# Altium PCB NB3000XN.PcbDoc (part 8 of 71)
Units mil, origin at the board's own origin, x right, y up, seen from the top; angles counter-clockwise.
Board outline 9527.56 x 6929.77 mil, 6 copper layers (Top Layer, GND+SHIELD, MidLayer1, MidLayer2, P2 - 3V3+5V0, Bottom Layer), stack 62.375 mil thick; 832 components, 1027 nets, 4655 pads, 4981 vias.
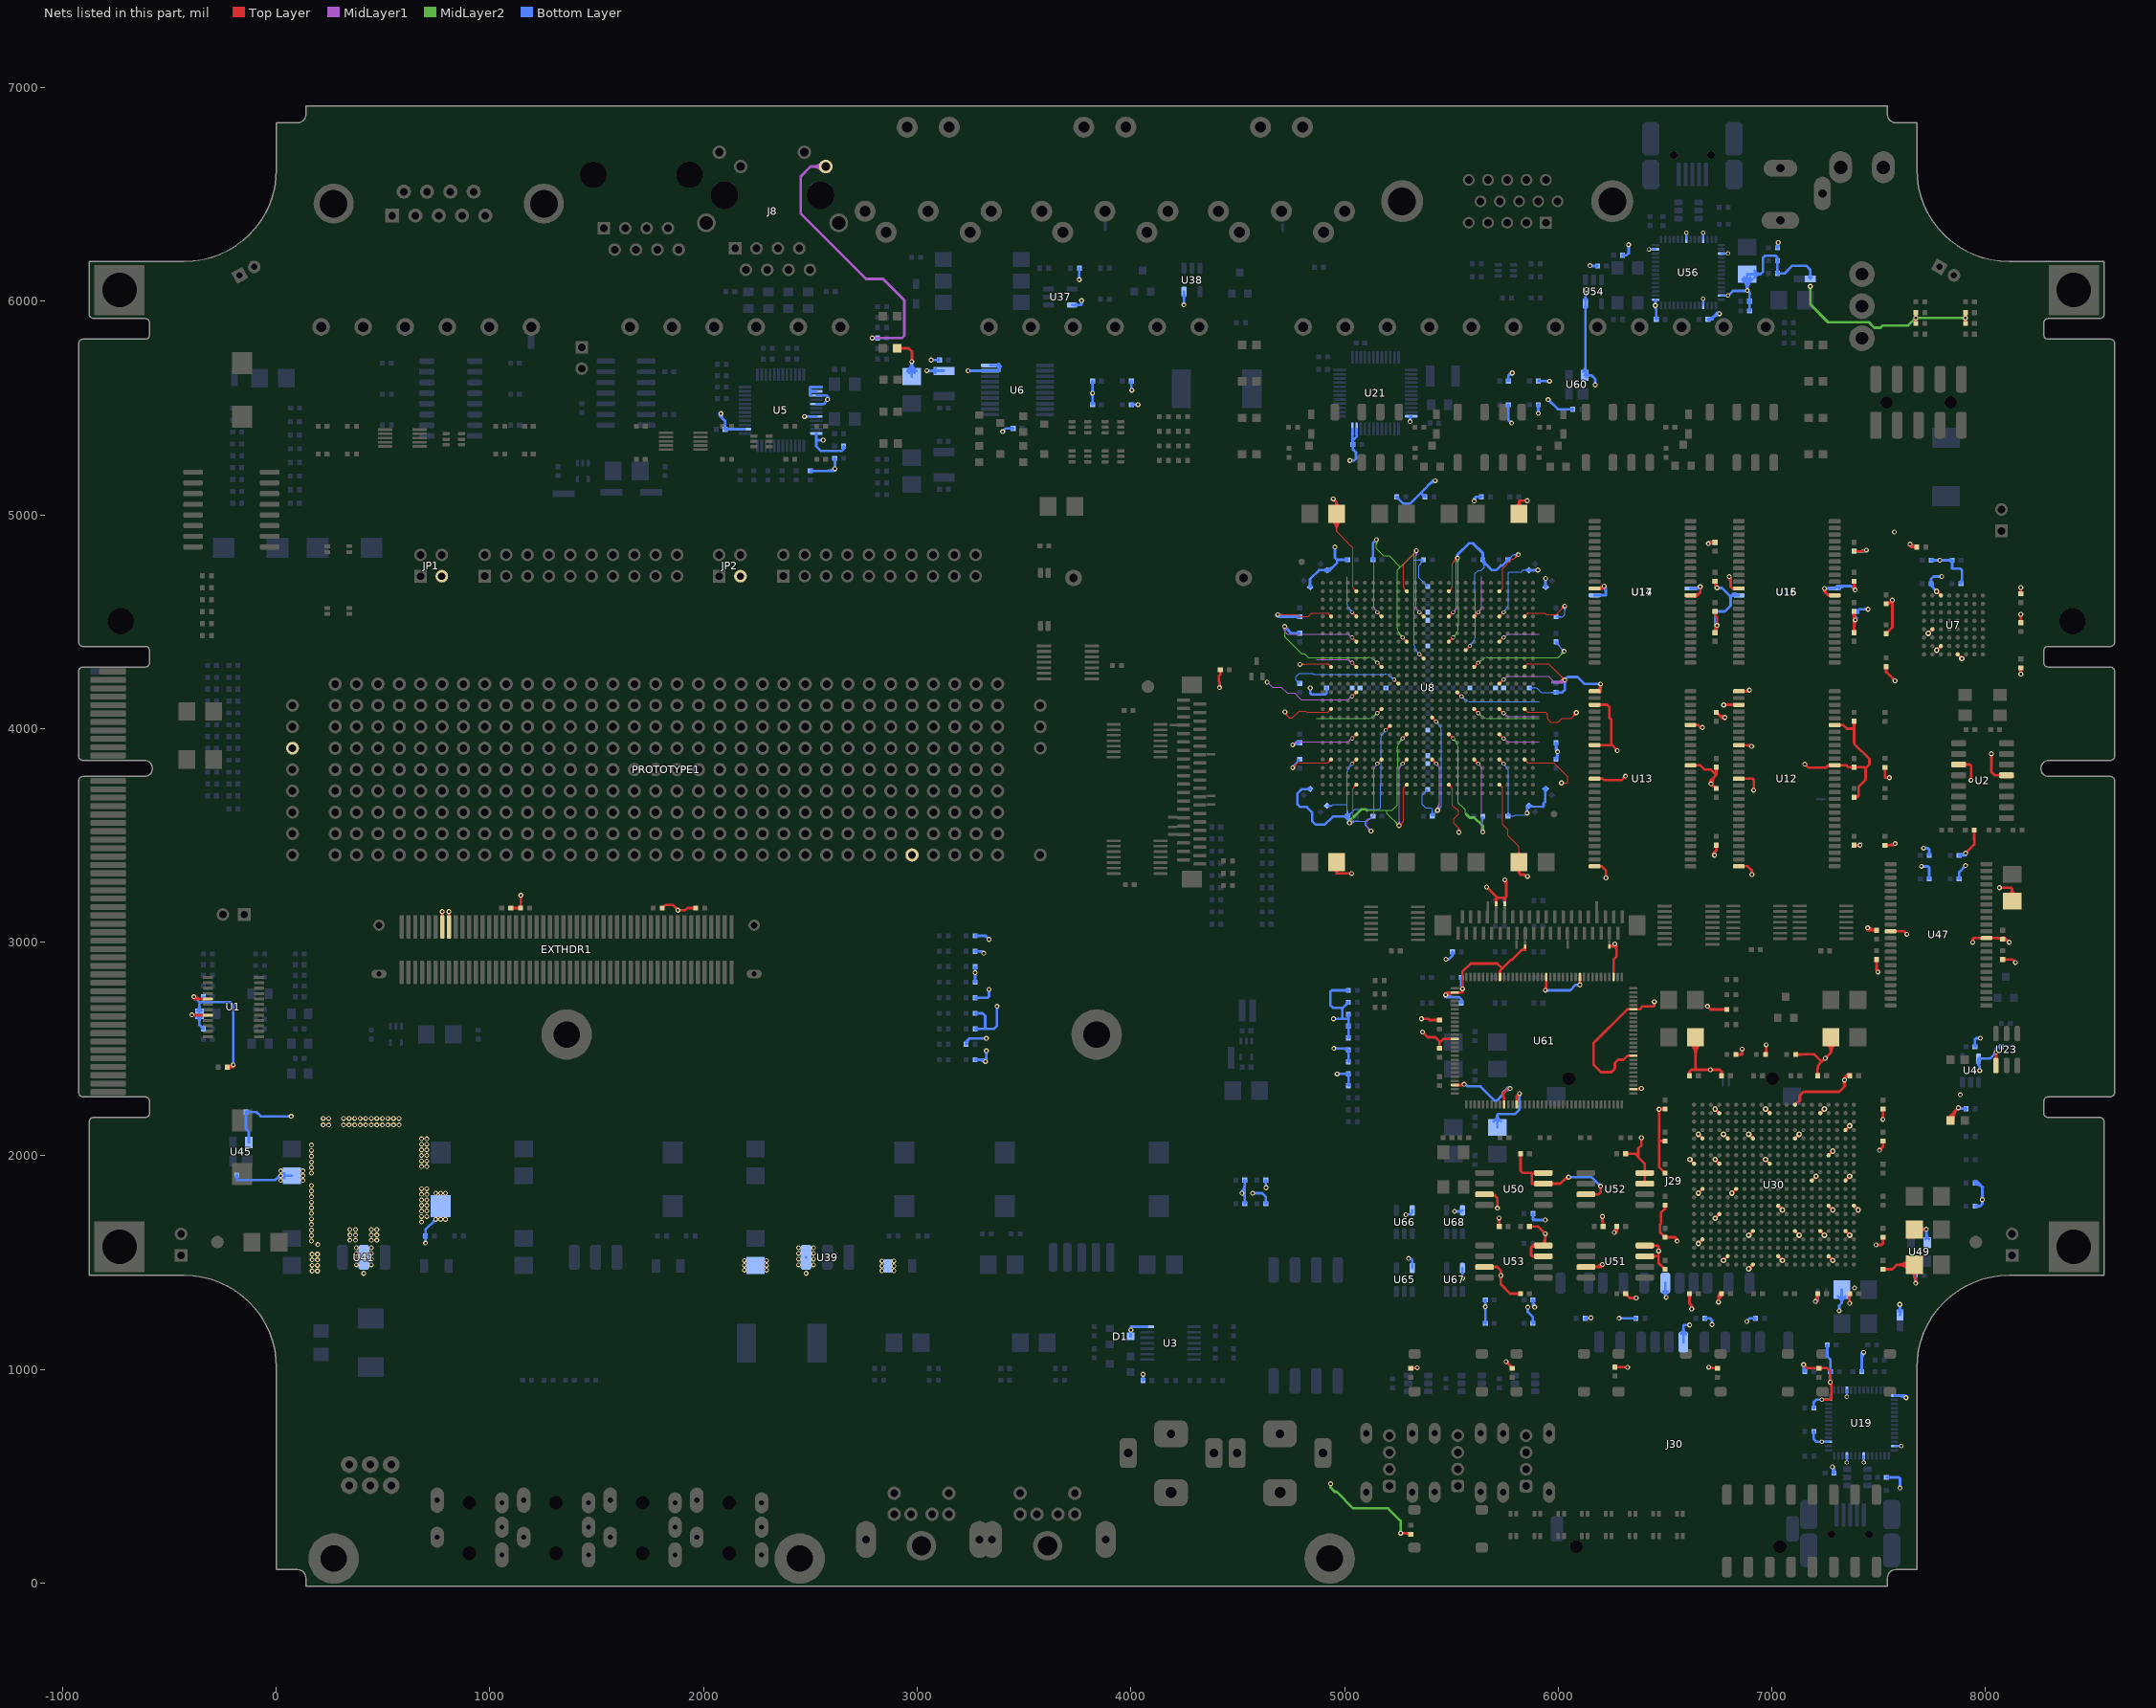
[diagram p12: the nets of this part, all layers, seen from the top]

## Via types
v1: diameter 23, hole 11.81, Top Layer to Bottom Layer, 3672 vias
v2: diameter 26, hole 11.81, Top Layer to Bottom Layer, 461 vias
v3: diameter 19, hole 11.81, Top Layer to Bottom Layer, tented both sides, 396 vias
v4: diameter 23.62, hole 11.81, Top Layer to Bottom Layer, 288 vias
v5: diameter 20, hole 11.81, Top Layer to Bottom Layer, 91 vias
v6: diameter 23, hole 11.81, Top Layer to Bottom Layer, tented both sides, 50 vias
v7: diameter 31, hole 11.81, Top Layer to Bottom Layer, 15 vias
v8: diameter 27.56, hole 11.81, Top Layer to Bottom Layer, tented both sides, 4 vias
v9: diameter 29, hole 11.81, Top Layer to Bottom Layer, 3 vias
v10: diameter 21, hole 11.81, Top Layer to Bottom Layer, 1 vias

## Nets (pads, with @x,y where several pads share a name; then routed paths per layer and width w, separated by ;. In a path a pad name is that pad's centre, name@x,y a point inside that pad or via, vN(x,y) a via of type N, cw(c..) or ccw(c..) an arc to the next point about the centre after c; other vN are vias at no path point) (continued)
3V3: (continued)
  Bottom Layer w4: v1@4757.52,3824.04 4758.52,3825.04 4758.7,3825.04 C322.1@4790,3856.34 ; v1@4757.52,3826.21 ccw(c4757.52,3831.87) 4761.53,3827.87 ; v1(4757.52,3924.04) v1@4758.52,3925.04 ; v1@4759.02,3816.71 cw(c4779.92,3816.71) 4765.14,3831.48 ; v1@4763.02,3816.71 cw(c4793.58,3816.71) 4771.97,3838.31 ; v1@4767.02,3816.71 cw(c4807.23,3816.71) C322.1@4778.8,3845.14 ; C322.1@4780.19,3856.34 cw(c4756.5,3856.34) 4773.25,3839.59 cw(c4790,3822.84) C322.1@4790,3846.53 ; C335.1@4780.19,4210.78 ccw(c4757.43,4211.05) 4773.53,4227.14 ; C323.1@4781.46,3928.28 ccw(c4773.19,3923.61) 4773.19,3933.11 ; C323.1@4781.46,3937.93 cw(c4773.19,3942.6) 4773.19,3933.11 ; C322.1@4784.19,3856.34 cw(c4770.16,3856.34) 4780.08,3846.42 cw(c4790,3836.5) C322.1@4790,3850.53 ; C335.1@4784.19,4210.74 ccw(c4770.71,4210.9) 4780.24,4220.43 ccw(c4789.77,4229.96) C335.1@4789.93,4216.48 ; C335.1@4789.89,4220.48 cw(c4789.62,4243.24) 4773.53,4227.14 ; C323.1@4790,3933.11 4773.19,3933.11 ; C335.1@4790,4210.67 4773.52,4227.15 ; C326.1@4917.56,3638.82 4940.19,3638.82 ; C326.1@4921.8,3634.85 cw(c4930.96,3626.27) 4930.96,3638.82 cw(c4930.96,3651.37) C326.1@4921.8,3642.79 ; C326.1@4924.72,3632.11 cw(c4940.19,3617.62) 4940.19,3638.82 ; C326.1@4924.72,3645.53 ccw(c4940.19,3660.01) 4940.19,3638.82 ; 4940.19,3639.04 4945.86,3644.71 5005,3644.71 ; 4948.52,3591.71 5000.42,3591.71 ; C331.1@5008.06,3596.94 ccw(c4998.8,3606.2) 5011.9,3606.2 ; 5008.57,3644.71 5005,3644.71 ; 5011.61,3644.71 5005,3644.71 ; C331.1@5011.9,3596.9 5011.9,3660 5011.9,3670 5011.9,3679.78 5011.9,3738.04 5011.9,3796.3 cw(c5035.67,3796.3) 5018.86,3813.11 5025.28,3820.84 ; 5011.9,3601.86 ccw(c5026.86,3601.86) C331.1@5016.28,3591.28 ; 5011.9,3611.51 ccw(c5036.51,3611.51) C331.1@5019.11,3594.11 ; 5011.9,3621.17 ccw(c5046.17,3621.17) C331.1@5021.94,3596.94 ; 5011.9,3648.22 5011.9,3655.26 ; 5011.9,4710 5011.9,4641.96 5011.9,4583.7 ccw(c5035.67,4583.7) 5018.86,4566.89 5025.28,4559.16 ; C331.1@5012.8,3580.44 cw(c5009.71,3566.97) v1@5023.52,3566.97 ; C331.1@5013.7,3584.34 cw(c5010.86,3572) 5023.52,3572 ; C331.1@5014.59,3588.24 cw(c5012.02,3577.02) 5023.52,3577.02 ; C331.1@5015,3595.81 ccw(c5015,3609.84) 5024.92,3599.92 ccw(c5034.84,3590) C331.1@5020.81,3590 ; C331.1@5015,3599.81 ccw(c5015,3623.5) 5031.75,3606.75 ccw(c5048.5,3590) C331.1@5024.81,3590 ; v1@5016.81,3565.09 ccw(c5000.59,3581.31) 5023.52,3581.31 ccw(c5046.46,3581.31) v1@5030.24,3565.09 ; v1@5019.64,3562.26 ccw(c5010.25,3571.65) 5023.52,3571.65 ccw(c5036.8,3571.65) v1@5027.41,3562.26 ; v1@5021.76,3560.14 cw(c5037.61,3544.29) 5037.61,3566.71 ; v1@5024.58,3557.31 cw(c5047.26,3534.64) 5047.26,3566.71 ; v1@5027.41,3554.49 cw(c5056.92,3524.98) 5056.92,3566.71 ; v3@5028.28,3834.37 cw(c5010.45,3831.22) 5025.28,3820.84 ; v3@5028.28,4545.63 ccw(c5010.45,4548.78) 5025.28,4559.16 ; v1@5030.24,3551.66 cw(c5066.58,3515.32) 5066.58,3566.71 ; v3@5036.97,3828.28 ccw(c5040.12,3810.45) 5025.28,3820.84 ; v3@5036.97,4551.72 cw(c5040.12,4569.55) 5025.28,4559.16 ; v1@5115.02,3520.71 ccw(c5092.09,3520.71) 5108.31,3536.93 ccw(c5124.52,3553.14) v1@5124.52,3530.21 ; v1@5119.02,3520.71 ccw(c5105.75,3520.71) 5115.14,3530.1 ccw(c5124.52,3539.49) v1@5124.52,3526.21 ; v1(5124.52,3520.71) 5098.52,3546.71 5098.52,3566.71 ; C330.1@5133.11,3590 5119.82,3576.71 5108.52,3576.71 5098.52,3566.71 ; 5169.38,3655.26 5169.38,3660 ; v3@5185.76,3991.85 cw(c5167.93,3988.7) 5182.76,3978.32 ; v3@5194.45,3985.76 ccw(c5197.6,3967.93) 5182.76,3978.32 ; v3@5225.05,4228.72 ccw(c5207.01,4227.14) 5218.65,4241.01 ; v3@5231.87,4236.84 cw(c5230.29,4254.88) 5218.65,4241.01 ; v1(5336.67,4832.5) 5337.54,4833.37 5339.52,4833.37 5326.77,4820.62 5326.77,4790 ; v3@5343.16,4348.13 ccw(c5325.12,4349.71) 5338.99,4361.35 ; 5350.34,4765.34 ccw(c5328,4787.67) C332.1@5359.54,4789.45 ; v3@5351.28,4354.95 cw(c5352.86,4372.99) 5338.99,4361.35 ; 5356.65,4771.65 ccw(c5339.97,4788.34) C332.1@5363.53,4789.67 ; 5362.26,4777.26 cw(c5369.33,4770.19) C332.1@5369.33,4780.19 ; C332.1@5362.39,4783.06 ccw(c5345.65,4766.31) 5345.65,4790 ccw(c5345.65,4813.69) C332.1@5362.39,4796.94 ; 5362.97,4777.97 ccw(c5351.93,4789.02) C332.1@5367.52,4789.9 ; C332.1@5365.22,4785.89 ccw(c5355.3,4775.97) 5355.3,4790 ccw(c5355.3,4804.03) C332.1@5365.22,4794.11 ; C317.1@5380.19,3715.59 cw(c5356.5,3715.59) 5373.25,3698.84 cw(c5390,3682.09) C317.1@5390,3705.78 ; C315.1@5380.19,4664.41 ccw(c5356.5,4664.41) 5373.25,4681.16 ccw(c5390,4697.91) C315.1@5390,4674.22 ; C317.1@5384.19,3715.59 cw(c5370.16,3715.59) 5380.08,3705.67 cw(c5390,3695.75) C317.1@5390,3709.78 ; C315.1@5384.19,4664.41 ccw(c5370.16,4664.41) 5380.08,4674.33 ccw(c5390,4684.25) C315.1@5390,4670.22 ; C317.1@5390,3715.59 5365,3690.59 5365,3670 5365,3660 5365,3645 5380,3630 5405,3630 5410.67,3624.33 C333.1@5410.67,3590 5410.67,3593.19 v1(5435.52,3618.04) 5453.23,3635.75 5453.23,3651.25 5453.23,3655.26 5453.23,3660 5453.23,3670 5453.23,3876.1 5453.23,3895.52 5453.23,3969.64 5453.23,3989.14 ccw(c5411.5,3989.14) 5441.01,4018.65 ; C313.1@5390,3873.07 C313.1@5390,3882.3 ; C315.1@5390,4664.41 5347.5,4706.91 5347.5,4710 5347.5,4720 5347.5,4762.5 5369.33,4784.33 C332.1@5369.33,4790 5326.77,4790 ; C333.1@5403.73,3596.94 ccw(c5386.98,3613.69) 5410.67,3613.69 ccw(c5434.36,3613.69) C333.1@5417.61,3596.94 ; C333.1@5406.56,3594.11 ccw(c5396.64,3604.03) 5410.67,3604.03 ccw(c5424.7,3604.03) C333.1@5414.78,3594.11 ; C333.1@5410.67,3599.81 ccw(c5410.67,3615.8) 5421.98,3604.5 ; C333.1@5416.48,3590 cw(c5438.2,3590) 5422.84,3605.36 ; C333.1@5420.48,3590 cw(c5451.86,3590) v1@5429.67,3612.19 ; v1@5426.02,3618.04 cw(c5403.09,3618.04) 5419.31,3601.82 cw(c5435.52,3585.61) v1@5435.52,3608.54 ; v3@5428.72,4025.05 cw(c5427.14,4007.01) 5441.01,4018.65 ; v1@5430.02,3618.04 cw(c5416.75,3618.04) 5426.13,3608.65 cw(c5435.52,3599.26) v1@5435.52,3612.54 ; v1@5435.52,3623.54 ccw(c5435.52,3636.82) 5444.91,3627.43 ccw(c5454.3,3618.04) v1@5441.02,3618.04 ; v1@5435.52,3627.54 ccw(c5435.52,3650.48) 5451.74,3634.26 ccw(c5467.96,3618.04) v1@5445.02,3618.04 ; v3@5436.84,4031.87 ccw(c5454.88,4030.29) 5441.01,4018.65 ; v3@5548.13,4143.16 cw(c5549.71,4125.12) 5561.35,4138.99 ; v3@5554.95,4151.28 ccw(c5572.99,4152.86) 5561.35,4138.99 ; v3@5585.55,4394.24 ccw(c5582.4,4412.07) 5597.24,4401.68 ; v3@5594.24,4388.15 cw(c5612.07,4391.3) 5597.24,4401.68 ; 5595.52,4866.71 5646.89,4815.34 ; C328.1@5639.95,3583.06 cw(c5623.2,3566.31) 5646.89,3566.31 cw(c5670.57,3566.32) C328.1@5653.83,3583.06 ; v1@5640.47,3522.76 ccw(c5624.98,3538.25) 5646.89,3538.25 ; C291.1@5640.8,4782.31 cw(c5619.23,4755.04) 5654,4755.04 ; C328.1@5642.78,3585.89 cw(c5632.86,3575.97) 5646.89,3575.97 cw(c5660.92,3575.97) C328.1@5651,3585.89 ; C291.1@5643.29,4785.44 cw(c5625.77,4763.3) 5654,4763.3 ; v1@5643.3,3519.93 ccw(c5634.64,3528.59) 5646.89,3528.59 ; C291.1@5645.77,4788.58 cw(c5632.31,4771.57) 5654,4771.57 ; 5646.89,3530.04 ccw(c5661.19,3530.04) v1@5651.08,3519.93 ; 5646.89,3539.7 ccw(c5670.85,3539.7) v1@5653.91,3522.76 ; C328.1@5646.89,3590 5646.89,3516.34 v1(5647.19,3516.04) ; C291.1@5646.89,4790 5654,4782.89 5654,4777.9 5654,4755.77 5638.23,4740 5624.8,4740 5610.62,4725.82 5610.62,4720 5610.62,4710 ; C291.1@5648.25,4791.72 cw(c5638.85,4779.83) C291.1@5654,4779.83 ; v3@5743.03,3828.28 cw(c5739.88,3810.45) 5754.72,3820.84 ; v3@5743.03,4551.72 ccw(c5739.88,4569.55) 5754.72,4559.16 ; v3@5751.72,3834.37 ccw(c5769.55,3831.22) 5754.72,3820.84 ; v3@5751.72,4545.63 cw(c5769.55,4548.78) 5754.72,4559.16 ; C329.1@5758.06,3596.94 ccw(c5734.24,3620.76) 5767.93,3620.76 ; C329.1@5760.89,3594.11 ccw(c5743.89,3611.11) 5767.93,3611.11 ; C307.1@5765,4790 5789.38,4814.37 v1(5813.52,4814.37) ; C307.1@5765,4795.81 ccw(c5765,4809.84) 5774.92,4799.92 ccw(c5784.84,4790) C307.1@5770.81,4790 ; C307.1@5765,4799.81 ccw(c5765,4823.5) 5781.75,4806.75 ccw(c5798.5,4790) C307.1@5774.81,4790 ; 5767.93,3606.61 ccw(c5781.61,3606.61) C329.1@5771.94,3596.94 ; 5768,3633.37 5767.93,3633.31 5767.93,3592.93 C329.1@5765,3590 5794.39,3590 5799.39,3595 5845,3595 v4(5855,3605) ; 5768.1,3633.37 5768.1,3655.26 5768.1,3660 5768.1,3670 5768.1,3679.78 5768.1,3738.04 5768.1,3796.3 ccw(c5744.33,3796.3) 5761.14,3813.11 5754.72,3820.84 ; v1@5806.81,4807.66 ccw(c5790.59,4791.44) 5790.59,4814.37 ccw(c5790.59,4837.31) v1@5806.81,4821.09 ; v1@5809.64,4810.49 ccw(c5800.25,4801.1) 5800.25,4814.37 ccw(c5800.25,4827.65) v1@5809.64,4818.26 ; C293.1@5855.5,4734.24 ccw(c5838.76,4717.5) 5838.76,4741.18 ccw(c5838.76,4764.87) C293.1@5855.5,4748.12 ; C293.1@5858.33,4737.07 ccw(c5848.41,4727.15) 5848.41,4741.18 ccw(c5848.41,4755.21) C293.1@5858.33,4745.29 ; C293.1@5862.44,4741.18 5835.18,4741.18 5827,4733 5772,4733 5768.1,4729.1 5768.1,4720 5768.1,4710 5768.1,4641.96 5768.1,4583.7 cw(c5744.33,4583.7) 5761.14,4566.89 5754.72,4559.16 ; C316.1@5864.41,4190 5900,4190 5920.67,4169.33 C334.1@5990,4169.33 ; C316.1@5868.52,4185.89 cw(c5878.44,4175.97) 5878.44,4190 cw(c5878.44,4204.03) C316.1@5868.52,4194.11 ; C316.1@5871.35,4183.06 cw(c5888.1,4166.31) 5888.1,4190 cw(c5888.1,4213.69) C316.1@5871.35,4196.94 ; 5893.33,4741.18 v1@5893.52,4741.37 ; v1@5896.19,4741.37 v1@5893.52,4741.37 ; 5910,4126.77 5703.9,4126.77 5684.48,4126.77 5610.36,4126.77 5590.86,4126.77 cw(c5590.86,4168.5) 5561.35,4138.99 ; v1@5910.86,4741.71 v1(5905,4741.71) 5896.52,4741.71 5893.86,4741.71 v1@5893.52,4741.37 ; C334.1@5983.06,4162.39 ccw(c5966.31,4145.65) 5966.31,4169.33 ccw(c5966.31,4193.02) C334.1@5983.06,4176.27 ; C334.1@5985.89,4165.22 ccw(c5975.97,4155.3) 5975.97,4169.33 ccw(c5975.97,4183.36) C334.1@5985.89,4173.44 ; C319.1@5990,4395.74 cw(c5990,4384.9) 5997.67,4392.56 ; C319.1@5990,4405.55 5990,4400.23 v1(6028.52,4361.71) ; C303.1@5990,4523.66 6020.14,4523.66 6030.52,4534.04 v1(6030.52,4573.71) ; C319.1@5991.81,4405.55 ccw(c6009.02,4405.55) 5996.85,4393.38 ; C303.1@5994.11,4519.55 cw(c6004.03,4509.63) 6004.03,4523.66 cw(c6004.03,4537.69) C303.1@5994.11,4527.77 ; C319.1@5995.81,4405.55 ccw(c6022.68,4405.55) 6003.68,4386.55 ; C303.1@5996.94,4516.72 cw(c6013.68,4499.98) 6013.68,4523.66 cw(c6013.69,4547.35) C303.1@5996.94,4530.6 ; C319.1@5999.81,4405.55 ccw(c6036.34,4405.55) 6010.51,4379.72 ; v1@6019.02,4361.71 ccw(c5996.09,4361.71) 6012.31,4377.93 ccw(c6028.52,4394.14) v1@6028.52,4371.21 ; v1@6023.02,4361.71 ccw(c6009.75,4361.71) 6019.14,4371.1 ccw(c6028.52,4380.49) v1@6028.52,4367.21 ; v1@6023.81,4566.99 cw(c6007.59,4550.77) 6030.52,4550.77 cw(c6053.46,4550.77) v1@6037.24,4566.99 ; v1@6026.64,4569.82 cw(c6017.25,4560.43) 6030.52,4560.43 cw(c6043.8,4560.43) v1@6034.41,4569.82 ; v1(6215.19,4666.71) 6223.52,4658.37 ; 4773.52,4227.15 4773.52,4243.71 4788.19,4258.37 4850,4258.37 4855.14,4253.23 4860,4253.23 4870,4253.23 5076.1,4253.23 5095.52,4253.23 5169.64,4253.23 5189.14,4253.23 cw(c5189.14,4211.5) 5218.65,4241.01 ; 5098.52,3566.71 5031.86,3566.71 v1(5023.52,3558.37) 5023.52,3568.61 5023.52,3581.48 C331.1@5015,3590 5048,3623 5163,3623 5169.38,3629.38 5169.38,3660 ; 5169.38,3660 5169.38,3670 5169.38,3679.78 5169.38,3738.04 5169.38,3953.78 cw(c5193.15,3953.78) 5176.34,3970.59 5182.76,3978.32 ; 5326.77,4790 5326.77,4724.74 5326.77,4720 5326.77,4710 5326.77,4503.9 5326.77,4484.48 5326.77,4410.36 5326.77,4390.86 ccw(c5368.5,4390.86) 5338.99,4361.35 ; 5597.24,4401.68 5603.66,4409.41 ccw(c5586.85,4426.22) 5610.62,4426.22 5610.62,4641.96 5610.62,4695 ; 5610.62,4695 5610.62,4700.22 5610.62,4710 ; 5610.62,4695 5610.62,4710
  Bottom Layer w8: C324.1@5866.26,3635 5926.9,3635 5928.52,3633.37 ; C324.1@5867.96,3644.34 ccw(c5890.52,3666.9) 5890.52,3635 ; v5(6424.34,6243.27) U56.55@6455.67,6243.27 ; v5@6428.58,6239.03 cw(c6438.82,6228.78) 6438.82,6243.27 cw(c6438.82,6257.75) v5@6428.58,6247.51 ; v5@6595.91,6316.42 cw(c6585.67,6306.18) 6600.16,6306.18 cw(c6614.64,6306.18) v5@6604.4,6316.42 ; U56.7@6600.16,6289.33 v5(6600.16,6320.66) ; v5@6674.65,6007.76 cw(c6664.41,5997.52) 6678.9,5997.52 cw(c6693.38,5997.52) v5@6683.14,6007.76 ; v5@6674.66,6316.42 cw(c6664.41,6306.18) 6678.9,6306.18 cw(c6693.38,6306.18) v5@6683.14,6316.42 ; U56.32@6678.9,5980.67 v5(6678.9,6012) ; U56.11@6678.9,6289.33 v5(6678.9,6320.66) ; U56.27@6764.33,6026.73 v5(6795.66,6026.73) ; U56.17@6764.33,6223.58 v5(6795.66,6223.58) ; v5@6791.42,6022.49 ccw(c6781.18,6012.25) 6781.18,6026.73 ccw(c6781.18,6041.22) v5@6791.42,6030.97 ; v5@6791.42,6219.34 ccw(c6781.18,6209.1) 6781.18,6223.58 ccw(c6781.18,6238.07) v5@6791.42,6227.83 ; v5(7234.34,858.27) U19.27@7265.67,858.27 ; v5@7238.58,854.03 cw(c7248.82,843.78) 7248.82,858.27 cw(c7248.82,872.75) v5@7238.58,862.51 ; v5@7346.86,568.58 ccw(c7336.62,578.82) 7351.1,578.82 ccw(c7365.59,578.82) v5@7355.34,568.58 ; v5@7346.86,877.24 ccw(c7336.62,887.48) 7351.1,887.48 ccw(c7365.59,887.48) v5@7355.35,877.24 ; v5(7351.1,564.34) U19.11@7351.1,595.67 ; v5(7351.1,873) U19.32@7351.1,904.33 ; v5@7425.6,568.58 ccw(c7415.36,578.82) 7429.84,578.82 ccw(c7444.33,578.82) v5@7434.09,568.58 ; v5(7429.84,564.34) U19.7@7429.84,595.67 ; U19.55@7574.33,641.73 v5(7605.66,641.73) ; v5@7601.42,637.49 ccw(c7591.18,627.25) 7591.18,641.73 ccw(c7591.18,656.22) v5@7601.42,645.97
  Bottom Layer w10: v1(5552.4,1427.4) U67.5@5552.4,1475.12
  Bottom Layer w11.81: v4@6450.82,5984.18 ccw(c6439.13,5995.87) 6455.67,5995.87 ; C174.2@6455.15,5919.18 ccw(c6445.07,5929.26) 6459.33,5929.26 ccw(c6473.59,5929.26) C174.2@6463.51,5919.18 ; 6455.67,5992.64 ccw(c6467.64,5992.64) v4@6459.18,5984.18 ; U56.43@6455.67,6007.05 6455.67,5982.85 6455.86,5982.85 6455.86,5980 6455.86,5966.04 ; 6455.86,5966.71 6455.86,5966.04 ; 6456.86,5964.85 6456.86,5965.04 6455.86,5966.04 ; C174.2@6459.33,5915 6459.33,5962.51 ; U19.43@7574.33,877.95 7618.28,877.95 v1(7628.52,867.71) ; U19.43@7590.28,877.95 cw(c7590.28,829.47) v1@7624.57,863.75 ; 7618.8,877.95 cw(c7618.8,857.98) v1@7632.92,872.1